# Altium PCB PCB2_OBC_ADCS_Auto.PcbDoc (part 2 of 2)
Units mm, origin at the board's own origin, x right, y up, seen from the top; angles counter-clockwise.
Board outline 198.36 x 95.9 mm, 4 copper layers (Top Layer, GND, PWR, Bottom Layer), stack 1.59 mm thick; 52 components, 110 nets, 475 pads, 53 vias.
Unrouted connection lines stored in the file: 29.
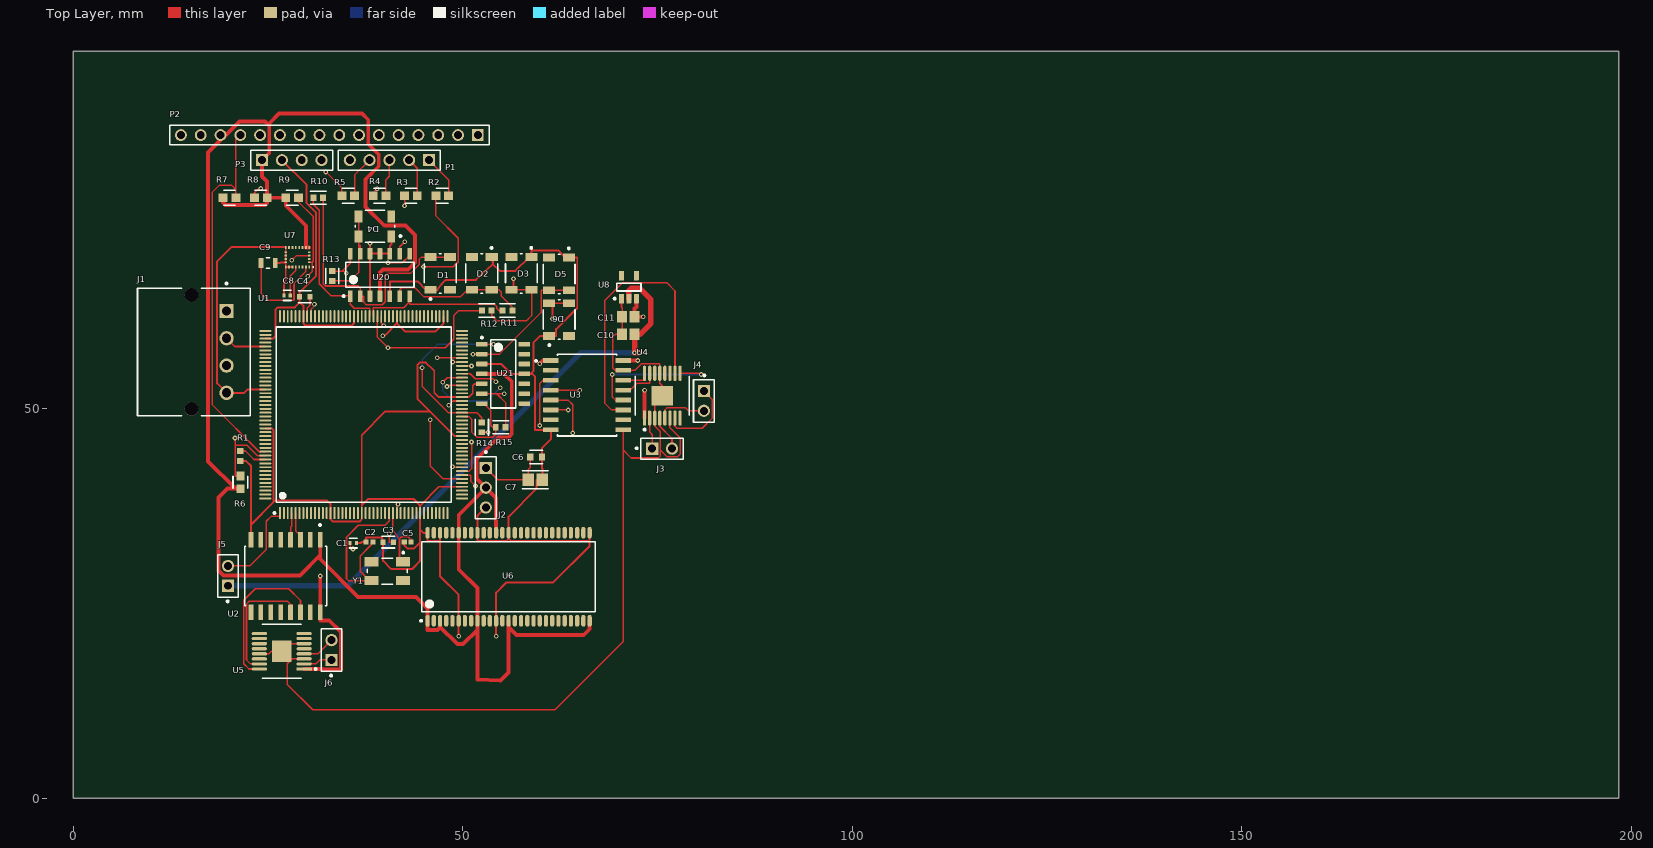
[diagram p0: Top Layer view]

## Via types
v1: diameter 0.6, hole 0.3, Top Layer to Bottom Layer, 53 vias

## Nets (pads, with @x,y where several pads share a name; then routed paths per layer and width w, separated by ;. In a path a pad name is that pad's centre, name@x,y a point inside that pad or via, vN(x,y) a via of type N, cw(c..) or ccw(c..) an arc to the next point about the centre after c; other vN are vias at no path point) (continued)
NetD2_3: (continued)
  Top Layer w0.2: U20.6 41.91,65.278 42.164,65.532 43.866,65.532 45.034,64.364 49.682,64.364 50.597,65.278 D2.3 D2.4 54.661,65.278 54.915,65.024 54.915,64.516 56.379,63.052 R11.1
NetD3_3: D3.3 D3.4 R12.1 U20.9 | length 31.3
  Top Layer w0.2: U20.9 41.91,70.79 v1(42.549,71.429) ; R12.1 53.713,61.959 54.356,61.316 58.166,61.316 58.826,61.976 58.826,65.278 D3.4 D3.3@56.515,65.278 ; D3.3 D3.3@56.515,65.278 ; v1(56.515,66.675) D3.3@56.515,65.278
  GND w0.2: v1(42.549,71.429) 47.303,66.675 v1(56.515,66.675)
NetD4_3: D4.3 D4.4 R13.1 U20.13 | length 12.3
  Top Layer w0.2: R13.1 35.56,66.429 36.629,67.497 36.629,71.118 ; D4.3 D4.4 36.629,71.118 ; U20.13 36.83,70.917 36.629,71.118
NetD5_3: D5.3 D5.4 R14.1 U21.2 | length 29
  Top Layer w0.2: v1(51.308,57.023) U21.2 54.712,57.023 60.046,62.357 60.046,65.21 D5.3 D5.4 ; R14.1 v1(53.238,46.998)
  GND w0.2: v1(51.308,57.023) 53.238,55.093 v1(53.238,46.998)
NetD6_3: D6.3 D6.4 R15.1 U21.6 | length 24.4
  Top Layer w0.2: U21.6 54.348,51.943 ; v1(55.321,51.943) 54.348,51.943 ; R15.1 55.491,50.8 54.348,51.943 ; D6.4 D6.4@61.519,63.556 ; v1(61.519,61.57) D6.4@61.519,63.556 ; D6.3 D6.4@61.519,63.556
  GND w0.2: v1(55.321,51.943) 55.321,52.451 61.519,58.649 v1(61.519,61.57)
NetJ5_2: J5.2 U1.1 | length 11.9
  Top Layer w0.2: J5.2 22.675,29.838 24.79,31.953 24.79,35.585 25.4,36.195 26.539,36.195 U1.1
NetR1_1: R1.1 U1.166 | length 3.7
  Top Layer w0.2: R1.1 22.108,44.592 23.199,43.502 U1.166
NetR2_2: R2.2 U1.50 | length 45.1
  Top Layer w0.2: v1(44.958,68.224) 48.768,68.224 49.428,68.885 49.428,71.882 46.55,74.76 R2.2 ; v1(45.822,48.59) 45.822,42.672 47.492,41.001 U1.50
  PWR w0.2: v1(44.958,68.224) 45.33,67.852 45.33,49.082 v1(45.822,48.59)
NetR3_2: R3.2 U1.51 | length 43.8
  Top Layer w0.2: v1(42.53,76.073) R3.2 ; U1.51 51.003,41.502 51.003,40.742 v1(51.638,40.107)
  PWR w0.2: v1(42.53,76.073) 45.68,72.923 45.68,50.408 51.638,44.45 v1(51.638,40.107)
NetR4_2: R4.2 U1.52 | length 44.2
  Top Layer w0.2: R4.2 38.557,77.343 38.557,77.8 v1(39.014,78.257) ; U1.52 50.8,42.001 51.13,42.332 v1(51.13,45.745)
  GND w0.2: v1(39.014,78.257) 39.014,68.199 50.749,56.464 51.283,56.464 51.689,56.058 51.689,46.304 v1(51.13,45.745)
NetR5_2: R5.2 U1.53 | length 49.7
  Top Layer w0.2: v1(32.436,80.391) 34.491,78.336 R5.2 ; v1(48.692,42.57) 48.761,42.502 U1.53
  PWR w0.2: v1(32.436,80.391) 32.436,58.826 v1(48.692,42.57)
NetU2_13: U2.13 U5.15 | length 16
  Top Layer w0.2: U5.15 22.768,17.262 22.25,17.78 22.25,24.943 22.606,25.298 27.497,25.298 27.903,24.892 U2.13
NetU2_14: U2.14 U5.16 | length 20.4
  Top Layer w0.2: U5.16 22.554,16.612 21.895,17.272 21.895,25.425 23.368,26.899 27.675,26.899 29.173,25.4 U2.14
NetU3_11: U3.11 U4.10 | length 36.8
  Top Layer w0.2: U3.11 69.088,49.858 68.25,50.696 68.25,63.932 70.485,66.167 76.2,66.167 77.234,65.133 U4.10
NetU3_12: U3.12 U4.9 | length 18.7
  Top Layer w0.2: v1(69.164,54.407) 69.164,51.56 69.596,51.128 U3.12 ; U4.9 77.884,54.559 80.442,54.559 v1(80.594,54.407)
  Bottom Layer w0.2: v1(69.164,54.407) v1(80.594,54.407)
NetU3_13: U3.13 U4.15 | length 5
  Top Layer w0.2: U3.13 71.448,52.398 72.314,53.264 73.984,53.264 U4.15
NetU3_14: U3.14 U4.16 | length 3.6
  Top Layer w0.2: U3.14 73.334,53.668 U4.16
PCLK: P2.9
PGND: C10.2 C11.1 U2.9 U2.15 U3.9 U3.15 U4.3 U4.6 U4.13 U4.17 U5.3 U5.6 U5.13 U5.17 U8.1 | length 132.8
  Top Layer w0.2: U5.13 25.146,18.562 25.471,18.887 U5.17 ; U5.3 28.123,17.912 ; U5.6 26.769,19.862 U5.17 ; U8.1 70.371,63.017 70.447,62.941 C11.1 C10.2 69.596,59.563 69.24,59.207 69.24,55.245 69.547,54.938 U3.15 72.108,54.938 72.974,55.804 75.284,55.804 U4.13 75.284,53.284 75.609,52.959 U4.17 74.634,51.685 U4.3 74.634,47.794 75.362,47.066 75.362,44.679 ; U3.9 70.587,47.318 70.587,44.704 ; U4.6 76.584,47.574 77.902,46.256 77.902,44.196 77.546,43.84 76.2,43.84 75.362,44.679 ; U5.17 26.769,17.912 28.123,17.912 ; 28.123,17.912 27.483,17.272 27.483,14.63 30.734,11.379 61.824,11.379 70.587,20.142 70.587,44.704 ; 70.587,44.704 71.603,43.688 75.108,43.688 75.362,43.942 75.362,44.679
PWM_A1: U1.77 U3.3 | length 21.3
  Top Layer w0.2: U1.77 50.959,54.501 51.613,53.848 53.873,53.848 v1(54.254,53.467) ; v1(59.868,47.854) 59.868,53.238 60.297,53.668 U3.3
  GND w0.2: v1(54.254,53.467) 54.254,50.724 57.125,47.854 v1(59.868,47.854)
PWM_A2: U1.76 U3.4 | length 28.4
  Top Layer w0.2: v1(47.414,53.407) 48.008,54.002 U1.76 ; U3.4 v1(65.024,52.398)
  GND w0.2: v1(54.813,52.705) 54.762,52.654 54.762,51.587 55.372,50.978 63.604,50.978 v1(65.024,52.398)
  Bottom Layer w0.2: v1(47.414,53.407) 47.414,52.358 48.768,51.003 53.111,51.003 v1(54.813,52.705)
PWM_B1: U1.74 U3.5 | length 33.9
  Top Layer w0.2: v1(47.981,52.857) 48.125,53.002 U1.74 ; U3.5 63.5,51.128 64.11,50.518 v1(64.11,46.888)
  GND w0.2: v1(47.981,52.857) 47.549,52.426 47.549,46.177 49.403,44.323 61.544,44.323 v1(64.11,46.888)
PWM_B2: U1.70 U3.6 | length 25.7
  Top Layer w0.2: v1(48.218,50.477) 48.743,51.002 U1.70 ; U3.6 v1(63.551,49.858)
  GND w0.2: v1(48.218,50.477) 48.218,47.438 50.8,44.856 58.549,44.856 v1(63.551,49.858)
PWM_C1: U1.5 U2.3 | length 3.7
  Top Layer w0.2: U1.5 28.539,34.366 29.173,33.732 U2.3
PWM_C2: U1.4 U2.4 | length 3.5
  Top Layer w0.2: U2.4 27.903,34.823 28.039,34.959 U1.4
SPI_MISO: P1.3 R4.1 | length 4.8
  Top Layer w0.2: R4.1 40.141,79.4 40.581,79.84 P1.3
SPI_MOSI: P1.4 R5.1 | length 5.4
  Top Layer w0.2: R5.1 36.121,79.995 P1.4
SPI_NSS: P1.1 R2.1 | length 5.6
  Top Layer w0.2: P1.1 48.181,79.395 R2.1
SPI_SCK: P1.2 R3.1 | length 5
  Top Layer w0.2: P1.2 44.161,80.875 R3.1
SUN_XN: R11.2 U1.108 U20.7 | length 19.5
  Top Layer w0.2: U1.108 38.539,62.967 42.418,62.967 43.18,63.729 ; U20.7 43.18,63.729 ; R11.2 54.61,62.611 54.356,62.865 54.356,63.144 54.102,63.398 43.256,63.398 43.18,63.475 43.18,63.729
SUN_XP: R10.2 U1.109 U20.1 | length 20.8
  Top Layer w0.2: R10.2 30.822,76.239 31.572,75.489 31.572,66.04 33.096,64.516 35.56,64.516 U20.1 35.56,63.424 36.068,62.916 38.039,62.916 U1.109
SUN_YN: R13.2 U1.106 U20.14 | length 14.6
  Top Layer w0.2: R13.2 34.544,67.683 ; v1(35.052,67.386) 34.756,67.683 34.544,67.683 ; U20.14 35.56,68.699 34.544,67.683 ; U1.106 39.539,60.969 v1(39.853,60.655)
  GND w0.2: v1(35.052,67.386) 35.052,65.456 v1(39.853,60.655)
SUN_YP: R12.2 U1.107 U20.8 | length 34.7
  Top Layer w0.2: U1.107 39.039,59.208 v1(40.411,57.836) 47.752,57.836 48.844,58.928 48.844,61.976 49.479,62.611 R12.2 ; v1(40.411,68.732) 42.233,68.732 43.18,69.679 U20.8
  PWR w0.2: v1(40.411,57.836) v1(40.411,68.732)
SUN_ZN: R15.2 U1.66 U21.7 | length 11.6
  Top Layer w0.2: U1.66 50.8,49.002 51.13,48.671 51.13,47.041 51.816,46.355 53.856,46.355 54.237,46.736 R15.2 53.848,47.625 53.594,47.879 53.594,49.784 52.705,50.673 U21.7
SUN_ZP: R14.2 U1.67 U21.1 | length 24.8
  Top Layer w0.2: v1(44.78,55.27) 44.78,52.905 48.184,49.502 U1.67 51.816,49.502 52.451,48.867 R14.2 ; U21.1 53.924,58.293 v1(53.95,58.268)
  Bottom Layer w0.2: v1(44.78,55.27) 44.78,56.286 46.761,58.268 v1(53.95,58.268)
SWCLK: J1.2 U1.137 | length 5.4
  Top Layer w0.2: J1.2 20.738,58.002 U1.137
SWDIO: J1.3 U1.124 | length 32.4
  Top Layer w0.2: U1.124 30.539,62.789 30.963,63.212 v1(30.963,63.424)
  GND w0.2: J1.3 18.491,56.749 18.491,66.04 23.19,70.739 27.432,70.739 29.083,69.088 29.083,65.303 v1(30.963,63.424)
V_BATT: C10.1 J5.1 U4.12 U5.12 U8.2 | length 77.7
  Top Layer w0.7: U8.2 71.321,65.174 71.628,65.481 72.669,65.481 74.143,64.008 74.143,60.96 72.746,59.563 C10.1 v1(72.047,57.201) v1(72.568,57.2)
  Bottom Layer w0.7: J5.1 35.248,27.298 65.151,57.201 v1(72.047,57.201)
VSYNC: P2.11
pads on no net: D1.2 D2.2 D3.2 D4.2 D5.2 D6.2 J1. U1.2 U1.3 U1.7 U1.8 U1.9 U1.10 U1.11 U1.12 U1.13 U1.16 U1.17 U1.18 U1.19 U1.20 U1.21 U1.24 U1.25 U1.26 U1.27 U1.28 U1.32 U1.33 U1.34 U1.35 U1.38 U1.40 U1.41 U1.42 U1.43 U1.44 U1.45 U1.46 U1.47 U1.54 U1.55 U1.56 U1.57 U1.58 U1.59 U1.60 U1.63 U1.64 U1.65 U1.68 U1.69 U1.73 U1.75 U1.78 U1.83 U1.84 U1.85 U1.86 U1.87 U1.88 U1.89 U1.92 U1.93 U1.94 U1.95 U1.96 U1.97 U1.98 U1.99 U1.100 U1.101 U1.104 U1.105 U1.110 U1.111 U1.112 U1.115 U1.116 U1.117 U1.118 U1.119 U1.120 U1.121 U1.122 U1.123 U1.128 U1.129 U1.130 U1.131 U1.132 U1.133 U1.134 U1.138 U1.139 U1.140 U1.141 U1.142 U1.143 U1.144 U1.145 U1.146 U1.147 U1.150 U1.151 U1.152 U1.153 U1.154 U1.155 U1.156 U1.157 U1.160 U1.161 U1.162 U1.163 U1.167 U1.168 U1.169 U1.170 U1.171 U1.173 U1.174 U1.175 U1.176 U2.2 U2.5 U2.6 U2.7 U2.10 U2.11 U2.12 U3.2 U3.7 U3.10 U4.8 U4.11 U4.14 U5.5 U5.7 U5.8 U5.9 U5.10 U5.11 U5.14 U6.36 U6.40 U7.9 U7.10 U7.11 U7.12 U8.4 U8.5 U21.8 U21.9 U21.10 U21.12 U21.13 U21.14 Y1.2 Y1.4

## Polygon pours and split planes (outlines as drawn)
PGND on GND "PGND_L02_P002" (solid, pour order 2): 0.635,54.483 1.397,54.483 89.535,54.483 89.535,12.954 88.9,13.589 0.508,13.589
DGND on GND "GND" (solid, pour order 1): 0,88.265 89.789,88.265 89.789,58.293 0.508,58.293 0.381,58.166
3V3_ISO on PWR "3V3_ISO" (solid, pour order 4): 0.508,54.356 89.408,54.356 89.408,13.589 0.635,13.589 0.381,13.843 0.381,54.102
3V3_DIGITAL on PWR "3V3_DIGITAL_L03_P003" (solid, pour order 3): 0,88.392 89.662,88.392 89.789,88.265 89.662,88.138 89.662,58.166 0.381,58.166 0,58.547

## Silkscreen, mask and mechanical layers (free items; w line width, h text height)
Mechanical 2:
  circle w0.013: c8.149,92.325 r1.6
  circle w0.013: c84.319,92.325 r1.6
  circle w0.013: c84.319,10.435 r1.6
  circle w0.013: c8.149,10.435 r1.6
  lines w0.013: 6.506,0.006 0.006,6.506 0.006,89.396 6.506,95.896 83.676,95.896 90.176,89.396 90.176,6.506 83.676,0.006 ; 7.649,3.435 84.819,3.435